# Altium PCB PY32E407Vx_START_ETH.PcbDoc (part 3 of 4)
Units mil, origin at the board's own origin, x right, y up, seen from the top; angles counter-clockwise.
Board outline 5249.65 x 2929.38 mil, 4 copper layers (Top Layer, GND, POWER, Bottom Layer); 253 components, 243 nets, 969 pads, 637 vias.
Unrouted connection lines stored in the file: 88.
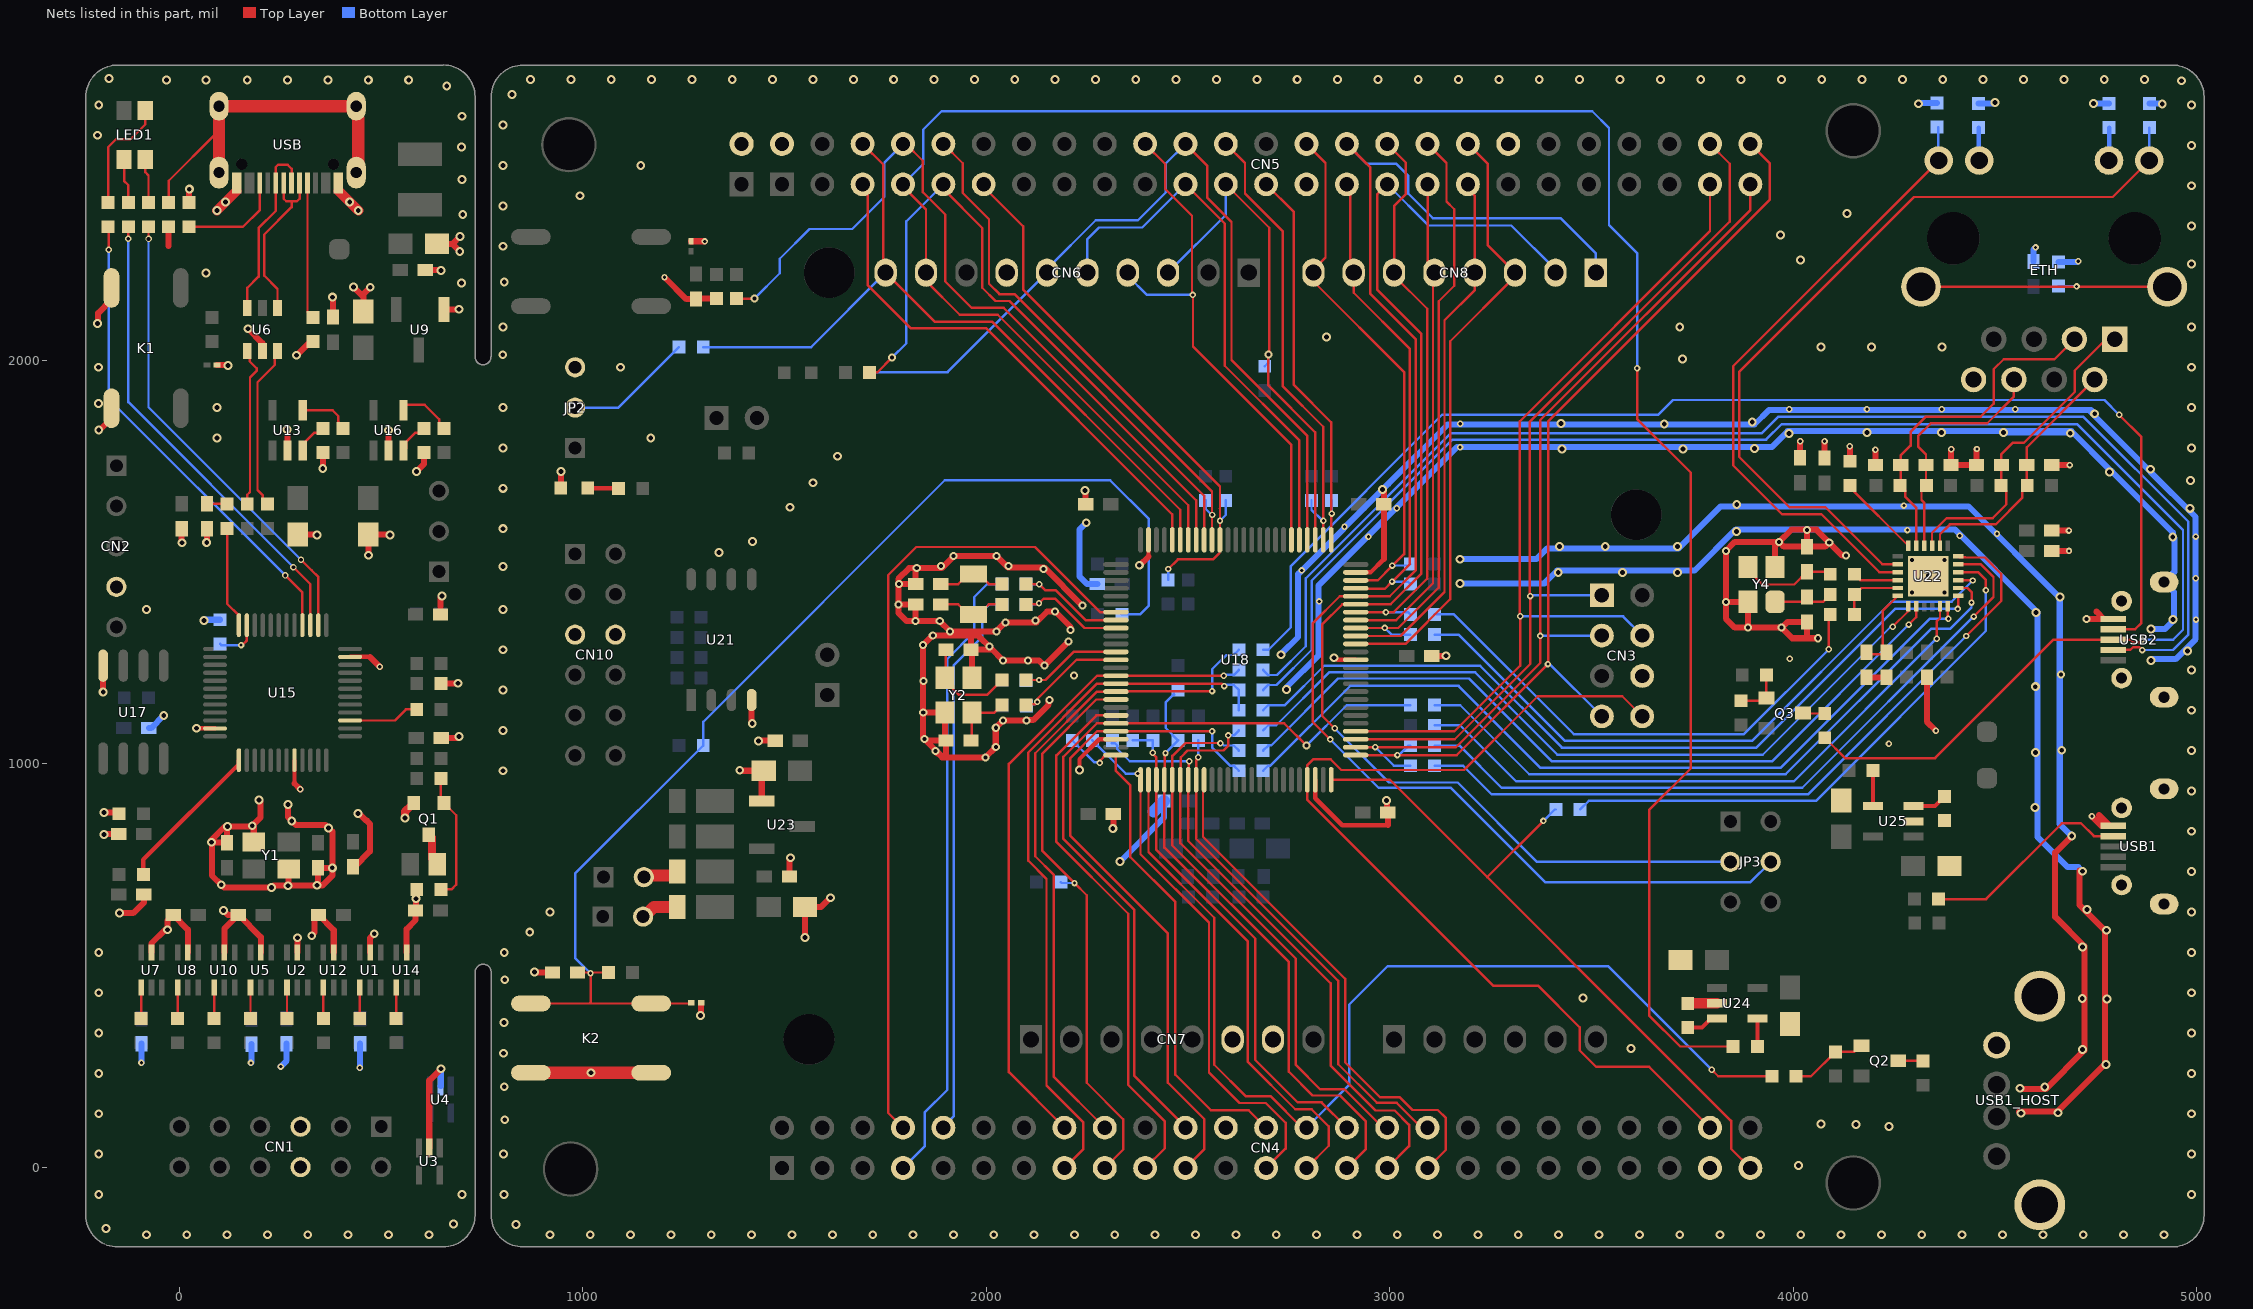
[diagram p4: the nets of this part, all layers, seen from the top]

## Via types
v1: diameter 22, hole 12, Top Layer to Bottom Layer, tented both sides, 393 vias
v2: diameter 16, hole 8, Top Layer to Bottom Layer, tented both sides, 115 vias
v3: diameter 20, hole 10, Top Layer to Bottom Layer, tented both sides, 54 vias
v4: diameter 16, hole 9, Top Layer to Bottom Layer, tented both sides, 41 vias
v5: diameter 30, hole 15, Top Layer to Bottom Layer, tented both sides, 16 vias
v6: diameter 20, hole 10, Top Layer to Bottom Layer, 9 vias
v7: diameter 15, hole 8, Top Layer to Bottom Layer, tented both sides, 5 vias
v8: diameter 16, hole 8, Top Layer to Bottom Layer, 3 vias
v9: diameter 20, hole 12, Top Layer to Bottom Layer, tented both sides, 1 vias

## Nets (pads, with @x,y where several pads share a name; then routed paths per layer and width w, separated by ;. In a path a pad name is that pad's centre, name@x,y a point inside that pad or via, vN(x,y) a via of type N, cw(c..) or ccw(c..) an arc to the next point about the centre after c; other vN are vias at no path point) (continued)
GND: C1.1 C2.1 C3.1 C4.1 C5.1 C6.1 C7.1 C8.1 C9.1 C10.1 C11.1 C12.1 C13.1 C14.1 C15.1 C16.1 C17.1 C18.1 C19.1 C20.1 C21.1 C22.1 C23.1 C24.1 C25.1 C26.1 C27.1 C28.1 C29.1 C30.1 C31.1 C32.1 C33.1 C34.1 C39.1 C40.1 C41.1 C42.1 C43.1 C44.1 C45.1 C46.1 C47.1 C48.1 C49.1 C50.2 C51.1 C52.1 C53.1 C54.1 C55.1 C56.1 C57.1 C58.1 C59.1 C60.1 C61.1 C62.1 CN1.5 CN1.6 CN2.4 CN3.6 CN4.24 CN4.47 CN5.2 CN5.27 CN5.38 CN6.7 CN7.6 CN7.7 CN10.5 CN10.6 CN11.2 ETH.8 JP2.3 K1.1 K2.2 L4.1 LED3.2 Q1.2 R1.1 R3.2 R7.2 R19.1 R20.1 R25.1 R27.2 R29.1 R32.2 R78.2 R82.1 R85.1 R93.1 R102.2 R103.1 R104.1 R106.1 R109.1 U1.2 U2.2 U3.2 U4.2 U5.2 U6.2 U7.2 U8.2 U9.1 U10.2 U11.2 U12.2 U13.2 U14.2 U15.8 U15.23 U15.47 U16.2 U17.4 U18.23 U18.48 U18.63 U18.74 U18.99 U19.2 U20.2 U21.4 U22.25 U23.1 U24.2 U25.2 USB1.5 USB1.6 USB1.7 USB1.8 USB1.9 USB1_HOST.4 USB1_HOST.5 USB2.5 USB2.6 USB2.7 USB2.8 USB2.9 USB.A1 USB.A12 USB.B1 USB.B12 Y1.2 Y1.4 Y2.2 Y2.4 Y4.2 Y4.4 | length 25054.4
  Top Layer w11: v1@42.64,1087.25 U15.47@88.04,1087.25 ; 285.03,950.62 U15.8@285.03,1008.18 ; U15.23@422.82,1264.27 472.02,1264.27 ; v1(2230.48,983.64) 2230.48,1011.16 2279.56,1060.24 U18.23@2320.76,1060.24 ; 2401.46,1512.92 U18.99@2401.46,1554.33 ; U18.48@2814.85,959.85 2814.85,913.94 2881.53,847.26 2994.61,847.26 ; v1(2860.83,1262.2) 2863.8,1262.2 2868.91,1257.09 U18.63@2915.24,1257.09 ; U18.74@2915.24,1473.63 2951.64,1473.63 2984.6,1506.59
  Top Layer w15: v1@-202.68,2090.73 v1(-202.93,2090.98) -201.59,2092.32 -201.59,2116.2 -168.61,2149.18 K1.1@-168.61,2178.71 ; v1(-200.02,1826.56) -198.13,1826.56 -166.61,1858.08 K1.1@-166.61,1871.26 ; U17.4@-189.3,1242.5 -189.3,1177.2 v1(-189.1,1177) ; v1(-187.5,824.4) -186.4,825.5 C22.1@-150.5,825.5 ; v1(-186.8,879.1) -153.1,879.1 R27.2@-149.5,875.5 ; v1(-148.9,629.19) -114.8,629.19 -88.5,655.49 C20.1@-88.5,675.5 ; U7.2@-69.37,531.35 -69.37,554.39 -35.78,587.99 v1(-30,587.99) -30,610.6 C9.1@-15.7,624.9 20.97,588.23 U8.2@20.97,531.35 ; -26.72,2282.14 R7.2@-26.72,2330.25 ; C5.1@5.5,1582 5.5,1548.19 v1(6.5,1547.19) ; R3.2@23.28,2390.25 23.28,2422.34 v1(24.38,2423.44) ; v1(42.5,1087.39) v1@42.64,1087.25 ; v1(67.41,1548.02) 68,1548.62 C16.1@68,1582 ; v1(79.73,804.88) 78.34,806.27 78.34,809.58 112.86,844.09 v1(119,844.09) 180,844.09 180.31,844.41 v1(180.31,845.73) 201.11,866.53 ; U11.2@92.8,1988 118.8,1988 v1(119.9,1986.9) ; v1(109.46,635.54) 120.09,624.9 C7.1@145.6,624.9 ; U10.2@111.31,531.35 111.31,590.61 C7.1@145.6,624.9 ; v1@118,843.09 C18.1@118,803.6 116.72,804.88 80.6,804.88 80.6,722.34 v1(103.41,699.53) 110.12,692.82 v1(228,692.82) 233.02,697.85 v1@340.42,697.85 ; USB.A12@141.34,2424.38 USB.A12@141.34,2454.43 ; v1(169.57,2077.44) 169.86,2077.44 205.5,2041.81 U6.2@205.5,2022.35 ; Y1.2@183.99,806.07 v1@183.99,842.05 ; v1(196.93,909.29) 200.79,905.43 200.79,866.85 ; U5.2@201.66,531.35 201.66,569.94 146.7,624.9 C7.1@145.6,624.9 ; v1(266.8,1827.9) 268,1826.7 U13.2@268,1775.5 ; v1(269.05,898.67) v1@269.3,898.92 ; v1@269.3,898.67 269.3,867.02 288.22,848.09 361.61,848.09 378.78,830.92 v1(378.78,741.6) ; v1@270.61,698.7 Y1.4@270.61,739.14 ; 285.03,950.62 v4(299.69,935.96) ; v1(290.2,2012) 323.7,2045.5 R1.1@330.5,2045.5 ; U2.2@292,531.35 292.07,531.42 292.07,567.82 v1(292.43,568.19) ; C6.1@293,1568 339.4,1568 v1(340.6,1566.8) ; v1(327.92,573.23) 327.92,575.12 334.56,581.76 334.56,622.22 337.24,624.9 C10.1@344.5,624.9 382.34,587.06 U12.2@382.34,531.35 ; v1(340.97,698.4) 354.87,698.4 378.78,722.31 v1(378.78,741.6) ; v1@343,700.43 C23.1@343,741.6 v1(378.78,741.6) ; v1(355.1,1731.5) 355.5,1731.9 R25.1@355.5,1770.5 ; v1(379.4,2155.8) 380.5,2154.7 C2.1@380.5,2106.5 ; USB.A1@394.32,2423.59 USB.A1@394.32,2454.49 ; C21.1@430.5,744.5 434.17,744.5 471.88,782.21 471.88,850.71 464.1,858.49 463.14,858.49 445.76,875.87 v1(442.78,875.87) ; v1(430.9,2181.4) 455.5,2156.8 ; C1.1@455.5,2120.5 455.5,2156.8 ; v1(468.62,1516.3) 468,1516.92 C15.1@468,1568 519.89,1568 v1(521.6,1566.29) ; 472.02,1264.27 v4(496.57,1239.72) ; U1.2@472.69,531.35 472.69,568.03 v1(482.82,578.16) ; v1(472.7,2180.4) 455.5,2163.2 455.5,2156.8 ; v1(517.6,1825.9) 518,1825.5 U16.2@518,1775.5 ; U14.2@563.03,531.35 563.03,589.77 585,611.74 C8.1@585,636.09 586,637.09 v1(586,665.09) 588,667.09 R19.1@588,688 ; Q1.2@573.6,895.37 Q1.2@580.6,902.37 ; v1(587.6,1723.94) 605.5,1741.84 R29.1@605.5,1770.5 ; C4.1@609.1,2223.2 646.7,2223.2 v1(647.8,2222.1) ; U3.2@619,47.46 619,214.18 v1(648.39,243.57) ; C3.1@638,2288 675.69,2288 ; C19.1@647,1369.3 647,1411.19 v1(650.8,1414.99) ; R20.1@648,1198 688.91,1198 v1(690,1199.09) ; C24.1@649,1063 689.21,1063 v1(693.1,1066.89) ; U9.1@655.5,2125.5 692.01,2125.5 v1(692.4,2125.89) ; v1(694.5,2269.19) 675.69,2288 ; v1(694.9,2306.09) 676.81,2288 675.69,2288 ; v1(879.9,482.99) 880.8,482.09 C29.1@924.5,482.09 ; LED3.2@945,1683.09 945,1723.19 v1(945.5,1723.69) ; v2(1202,2205.09) 1256,2151.09 C39.1@1280.5,2151.09 1281.5,2152.09 R82.1@1330.5,2152.09 ; U20.2@1268,2294.4 1301.1,2294.4 v2(1301.55,2293.94) ; v1(1291.5,375.24) 1292.8,376.54 U19.2@1292.8,407.09 ; v1(1388.5,983.39) 1389.8,982.09 C55.1@1448,982.09 1443,977.09 U23.1@1443,907.09 ; U21.4@1418,1157.49 1418,1100.59 v1(1419.4,1099.19) ; v1(1434.7,1055.49) 1435.8,1056.59 C56.1@1476.4,1056.59 ; C57.1@1511.6,720.29 1511.6,763.79 v1(1514.4,766.59) ; v1(1550.34,569.03) 1550.5,569.19 C54.1@1550.5,644.59 1590.3,644.59 v1(1613.21,667.51) ; v3@1781.7,1395.19 v3(1782.3,1394.59) C28.1@1824.5,1394.59 v3(1824.5,1353.19) v3@1824.6,1353.09 ; v3(1782.7,1444.59) C27.1@1824.5,1444.59 1824.5,1481.79 v3(1827.2,1484.49) ; v3(1843.29,1126.28) Y2.4@1897.03,1126.28 1897.03,1057.09 v3@1849.7,1057.09 ; v3(1873.6,1030.69) 1879.11,1025.19 1880.26,1025.19 1890.15,1015.29 1891.5,1015.29 ; C26.1@1899.5,1057.09 1899.5,1015.79 1900,1015.29 ; 1961.5,1316.59 C25.1@1961.5,1282.09 ; Y2.2@1963.96,1212.9 1963.96,1279.63 C25.1@1961.5,1282.09 ; v3(2007,1290.49) 2007,1289.59 v3@2012.8,1283.79 ; v3@2098.7,1106.39 v3(2040.7,1106.39) v3(2023,1088.69) v3(2023,1040.79) v3(1997.5,1015.29) 1891.5,1015.29 ; v3@2099.68,1107.78 2115.68,1107.78 2153.78,1145.88 2153.78,1154.94 v3(2156.6,1157.76) v3@2158.2,1157.76 ; v3(2203.4,1302.59) v3(2143.3,1242.49) 2129.9,1255.89 v3(2102.4,1255.89) v3(2040.7,1255.89) v3@2012.8,1283.79 ; v3(2208.6,1331.19) 2208.6,1338.49 v3(2170.2,1376.89) 2150.4,1376.89 2123.35,1349.85 v3(2046.85,1349.85) v3(2024.7,1327.69) v3(1909.6,1327.69) v3(1884.2,1353.09) v3@1824.6,1353.09 ; v3(2237.6,1391.29) 2142.7,1486.19 2053,1486.19 v3(2025.2,1513.99) v3(1918.38,1513.99) 1888.88,1484.49 v3(1827.2,1484.49) ; v1(2244.3,1676.89) 2245.7,1675.49 C34.1@2245.7,1642.49 ; v1(2313.1,839.19) 2314.54,840.63 C32.1@2314.54,875.01 ; v1(2378.76,1491.31) 2379.86,1491.31 2401.46,1512.92 ; v1(2981.33,1679.59) 2984.6,1676.31 C33.1@2984.6,1642.49 2984.6,1506.59 ; v1(2991.68,908.4) 2993.02,907.06 C31.1@2993.02,875.17 ; 2994.61,847.26 C31.1@2994.61,878.2 ; C30.1@3103.8,1266.29 3137.94,1266.29 v1(3138.8,1267.16) ; v3(3832.9,1400.79) Y4.4@3887.53,1400.79 3887.53,1337.13 v3(3887.1,1336.7) ; Y4.2@3954.46,1487.4 3954.46,1539.36 v3(3964.41,1549.3) ; C48.1@4016.2,1757.89 4016.2,1798.49 v2(4016.7,1798.99) ; 4033.5,1315.04 C51.1@4033.5,1350.59 3984.59,1350.59 v3(3970.7,1336.7) ; v3(4033.5,1578.79) C50.2@4033.5,1537.59 ; v3(4061,1310.49) 3996.9,1310.49 v3(3970.7,1336.7) ; C47.1@4076.7,1757.19 4076.7,1798.29 v2(4076.9,1798.49) ; v3(4088.65,1547.64) 4078.6,1537.59 C50.2@4033.5,1537.59 ; v3(4130.2,1515.39) 4120.9,1515.39 4056.4,1579.89 3995,1579.89 v3(3964.41,1549.3) ; v2(4139.5,1786.29) 4139.7,1786.09 R102.2@4139.7,1749.09 ; C52.1@4180.5,1213.59 C53.1@4230.5,1213.59 ; v2(4203.1,1777.59) 4203.4,1777.29 C41.1@4203.4,1739.59 ; C49.1@4330.5,1213.59 4330.5,1103.79 v2(4353.1,1081.19) ; v2(4391.2,1778.89) 4390.4,1778.09 C42.1@4390.4,1739.59 C43.1@4453.4,1739.59 4453.4,1778.39 v2(4454.5,1779.49) ; v1@4558.7,137.29 4654.1,137.29 4771.91,255.1 4771.91,586.39 4709.26,649.04 4709.26,734.45 4714.88,734.45 v1(4716.11,733.22) ; v1@4560.6,193.19 4625.05,193.19 4720.9,289.05 4720.9,547.89 4648.6,620.19 4648.6,779.13 v1(4689.69,820.22) ; C45.1@4640,1527.09 4682.58,1527.09 v2(4682.74,1526.86) v2(4682.74,1526.86) ; C46.1@4640,1577.09 4682.44,1577.09 v2(4682.72,1577.37) ; C44.1@4640.4,1739.59 4640.5,1739.69 v2(4684.5,1739.69) ; v6(4726,1357.99) 4726.12,1357.99 4726.4,1358.27 USB2.5@4792.65,1358.27 4769.02,1358.27 4751.15,1376.15 ; v2(4739.5,869.39) 4763.12,845.77 USB1.5@4783.82,845.77 ; 4757.6,871.99 USB1.5@4783.82,845.77 ; USB1.5@4792.65,845.77 USB1.5@4783.82,845.77 ; v3@1824.6,1353.09 1802.3,1353.09 1781.7,1373.69 1781.7,1457.79 1808.4,1484.49 v3(1827.2,1484.49) ; v3@1849.7,1057.09 1843,1063.79 v3(1843,1293.89) v3(1866.9,1317.79) 1978.8,1317.79 v3@2012.8,1283.79 ; v3@1849.7,1057.09 1891.5,1015.29 ; C25.1@1961.5,1282.09 2011.1,1282.09 v3@2012.8,1283.79 ; v3(3964.41,1549.3) 3976.12,1537.59 C50.2@4033.5,1537.59 ; v3(3964.41,1549.3) 3854.89,1549.3 v3(3832.39,1526.8) 3832.39,1359.01 3854.7,1336.7 v3(3970.7,1336.7)
  Top Layer w20: v1(559.11,864.91) 559.11,880.88 Q1.2@573.6,895.37
  Top Layer w25: v1(92.86,2370.4) v1(114.23,2391.77) USB.A12@141.38,2418.92 ; USB.A1@394.62,2418.92 v1(421.77,2391.77) v1(443.14,2370.4) ; R85.1@3738.01,405.81 3738.08,405.89 3810.5,405.89 U24.2@3810.58,405.96
  Top Layer w30: K2.2@871,233.59 K2.2@1169,233.59
  Bottom Layer w15: C12.1@-94.3,305.6 v2(-94.3,258.39) v2@-94,258.09 ; C17.1@-76,1088 -70.1,1088 v1(-38.9,1119.2) ; v1(61.1,1354.39) 63.1,1356.39 R32.2@100.8,1356.39 ; v2(177,258.09) 178.2,259.29 C13.1@178.2,304.3 ; v2(251,249.09) 265.7,263.79 C11.1@265.7,305.7 ; v2(447,246.09) 447.9,246.99 C14.1@447.9,305.7 ; U4.2@647,200.46 647.7,201.16 647.7,242.87 v1(648.39,243.57) ; v1(2247.1,1596.79) 2230.1,1579.79 2230.1,1464.19 2249.7,1444.59 C58.1@2274.5,1444.59 ; v1(2330.8,756.95) 2440.4,866.55 R78.2@2440.4,907.19 ; v1(2730.3,1269.49) 2730.3,1271.79 2772.11,1313.6 2772.11,1469.41 2774.8,1472.09 2996.09,1693.38 ; v1(2743.43,1183.82) 2743.43,1188.93 2823.22,1268.72 2823.22,1441.62 3166.55,1784.95 3946.85,1784.95 3985.62,1823.71 v1@4688.98,1823.71 ; v1(2981.33,1679.59) 2982.29,1679.59 2996.09,1693.38 ; v1(3173.2,1446.49) 3382.5,1446.49 3414.5,1478.49 3755,1478.49 3857,1580.49 4399.6,1580.49 v1@4604.5,1375.59 ; v1(3173.2,1506.39) 3362.61,1506.39 3389.01,1532.79 3714.9,1532.79 3819.3,1637.19 4433.7,1637.19 4659.9,1410.99 4659.9,850.3 4661.37,848.83 4661.37,848.42 4689.58,820.22 v1(4689.69,820.22) 4686.88,823.03 v1@4686.88,824.84 ; v1(3679.69,1841.89) 3681.25,1840.33 v1@3903.43,1840.33 ; v1(4309.48,2635.12) 4311.46,2637.09 R104.1@4355.5,2637.09 ; R106.1@4459,2636.09 4497.36,2636.09 v1(4499.61,2638.34) ; v1(4520.38,1820.15) 4685.42,1820.15 v1@4688.98,1823.71 ; C40.1@4594.5,2244.09 4594.5,2273.59 v2(4600,2279.09) ; v1(4600.86,1374.3) 4603.2,1374.3 v1@4604.5,1375.59 ; L4.1@4657,2243.09 4704,2243.09 v2(4705.5,2244.59) ; v1(4716.11,733.22) 4706.08,743.25 4679.74,743.25 4604.5,818.49 4604.5,890.77 4604.5,1032.22 4604.5,1190.49 v1@4604.5,1375.59 ; v1(4743.69,2636.07) R109.1@4782,2636.09 ; v1(4746.43,1866.91) 4736.63,1876.71 4731.08,1876.71 ; v1(4783.11,1722.47) 4789.94,1722.47 4939.87,1572.55 v1(4939.87,1561.82) 4943.3,1558.38 4943.7,1558.38 4943.7,1475.15 USB2.7@4918.35,1449.8 4942.78,1425.37 4942.78,1359.02 v1(4940.65,1356.89) ; v1@4786.67,1726.03 v1@4688.98,1823.71 ; R103.1@4882,2636.09 4912.44,2636.09 v1(4913.76,2634.78) ; v1(4884.42,1729.44) 4884.42,1723.37 4996.8,1610.99 ; v1(4886.1,1255.3) 4889.43,1258.64 4947.18,1258.64 4996.8,1308.26 4996.8,1610.99 ; v1@4888.51,1330.89 v1(4886.1,1333.29) 4920.41,1333.29 v1@4940.65,1353.53 ; 2996.09,1693.38 3143.03,1840.33 v1@3903.43,1840.33 ; v1@3903.43,1840.33 3939.82,1876.71 4731.08,1876.71 ; 4731.08,1876.71 4996.8,1610.99
  Bottom Layer w30: 2414.4,881.19 R78.2@2440.4,907.19
  other v1: -82,-167.91 18,-167.91 118,-167.91 218,-167.91 318,-167.91 418,-167.91 518,-167.91 618,-167.91 918,-167.91 1018,-167.91 1118,-167.91 1218,-167.91 1318,-167.91 1418,-167.91 1518,-167.91 1618,-167.91 1718,-167.91 1818,-167.91 1918,-167.91 2018,-167.91 2118,-167.91 2218,-167.91 2318,-167.91 2418,-167.91 2518,-167.91 2618,-167.91 2718,-167.91 2818,-167.91 2918,-167.91 3018,-167.91 3118,-167.91 3218,-167.91 3318,-167.91 3418,-167.91 3518,-167.91 3618,-167.91 3718,-167.91 3818,-167.91 3918,-167.91 4018,-167.91 4118,-167.91 4218,-167.91 4318,-167.91 4418,-167.91 4518,-167.91 4618,-167.91 4718,-167.91 4818,-167.91 4918,-167.91 -182,-151.91 833.96,-142.12 678.76,-140.85 -200,-67.91 700,-67.91 804,-67.91 4986,-67.91 4012.37,4.18 -200,32.09 803,32.09 4986,32.09 4236.71,100.63 4154.5,105.23 4068,107.09 806,117.09 -200,132.09 4986,132.09 4564.07,133.4 4655.66,134.66 4561.61,195.4 4622.77,198.53 805,199.09 -200,232.09 4986,232.09 1020,233.59 4774.65,253.93 803,282.09 4715.92,291.09 3597.36,293.89 -200,332.09 4986,332.09 804,358.09 4777.1,416.27 4715.62,417.47 3478.66,418.72 -200,432.09 4986,432.09 806,464.09 -200,532.09 805,532.09 4986,532.09 4715.94,545.57 868,582.09 4775.74,586.97 918,632.09 4986,632.09 4727.01,638.57 269,697.09 4986,732.09 4986,832.09 369.17,840.53 278.29,858.03 4598.86,890.77 4986,932.09 802,982.09 4600,1027.09 4986,1032.09 4664.91,1033.05 802,1082.09 4986,1132.09 802,1182.09 4599.3,1190.49 4986,1232.09 4976.16,1279.08 802,1282.09 -82,1382.09 802,1382.09 4660.78,1412.8 3417.12,1473.15 3576.08,1473.33 3712.6,1473.53 802,1488.09 1336.8,1522.89 3420.44,1538.04 3533.62,1537.99 3712.45,1537.97 1420.1,1550.69 3859.03,1575.43 802,1582.09 4982.77,1632.55 1512.8,1635.09 3859.49,1641.92 802,1682.09 1570.1,1695.99 4983.9,1701.29 1630.4,1761.59 3426.61,1779.85 3726.4,1779.79 3903.69,1780.4 802,1782.09 4986,1782.09 93,1807.09 1168,1807.09 3988.62,1817.95 4685.9,1818.65 4182.4,1820.15 4366.6,1820.15 3424.17,1843.05 3897.7,1846.79 93,1882.09 802,1882.09 4986,1882.09 -201,1892.09 -201,1982.09 1093,1982.09 4986,1982.09 3724.58,2002.32 801,2013.09 4068,2032.09 4193,2032.09 4368,2032.09 2843,2057.09 802,2082.09 3718,2082.09 4986,2082.09 699,2191.09 805,2193.09 65.99,2215.64 4986,2238.09 4017,2248.09 802,2282.09 3968,2310.09 4986,2332.09 702,2361.09 4133,2363.09 802,2382.09 993,2407.09 4986,2432.09 700,2447.09 802,2482.09 1143,2482.09 699,2528.09 4986,2532.09 -203.37,2557.18 802,2582.09 700,2604.09 -200,2632.09 4986,2632.09 823.72,2657.76 662.32,2679.51 4962,2692.09 -32,2694.09 66,2694.09 168,2694.09 268,2694.09 368,2694.09 468,2694.09 568,2694.09 870,2695.09 970,2695.09 1070,2695.09 1170,2695.09 1270,2695.09 1370,2695.09 1470,2695.09 1570,2695.09 1670,2695.09 1770,2695.09 1870,2695.09 1970,2695.09 2070,2695.09 2170,2695.09 2270,2695.09 2370,2695.09 2470,2695.09 2570,2695.09 2670,2695.09 2770,2695.09 2870,2695.09 2970,2695.09 3070,2695.09 3170,2695.09 3270,2695.09 3370,2695.09 3470,2695.09 3570,2695.09 3670,2695.09 3770,2695.09 3870,2695.09 3970,2695.09 4070,2695.09 4170,2695.09 4270,2695.09 4370,2695.09 4470,2695.09 4570,2695.09 4670,2695.09 4770,2695.09 4870,2695.09 -174.29,2697.44
  other v2: 4236.47,1049.29 3990.68,1259.83 2824.77,1401.74 2781.04,1478.69 2946.41,1562.33 4412.1,1564.79 4504.4,1569.69 4282.3,1578.59 2887.21,1586.96 3016.87,1632.8 4273.8,1639.19 3173.63,1783.63 3174.39,1841.92 4182,1877.79 4549.5,1877.79 3989.3,1878.09 4367.6,1877.99
  other v3: 1846.35,1060.44 2098.7,1106.79 1843.4,1204.29 2216.94,1217.83 4663.4,1221.19 2121.18,1354.21 4293.3,1424.29 4373.7,1424.29 2140.92,1481.84 1886.81,1489.23 2054.82,1490.11
  other v6: 4333.1,1465.49 4293.3,1504.69 4373.7,1504.69
  other v8: 4997.55,1356.78 4997.17,1459.31 4997,1562.49
L_USB_CN_DM: U6.4 USB.A7 USB.B7 | length 429.3
  Top Layer w6: U6.4@242.9,2128.65 242.9,2176.2 210,2209.1 210,2311.09 277.85,2378.94 277.85,2393.5 ; USB.A7@258.16,2438.92 258.16,2399.87 264.53,2393.5 277.85,2393.5 ; USB.B7@297.53,2438.92 297.53,2399.87 291.16,2393.5 277.85,2393.5
L_USB_CN_DP: U6.6 USB.A6 USB.B6 | length 459.8
  Top Layer w6: U6.6@168.1,2128.65 168.1,2178.79 196,2206.69 196,2327.24 238.47,2369.71 USB.B6@238.47,2438.92 238.47,2478.14 244.33,2484 268,2484 277.84,2474.16 USB.A6@277.84,2438.92
LAN8720_CRS_DV: R58.1 U22.11 | length 1531.5
  Top Layer w6: v2(4354.82,1309.49) 4354.82,1351.91 4363.03,1360.12 U22.11@4363.03,1389.49
  Bottom Layer w6: R58.1@3110.5,1094.59 3174.1,1094.59 3312.59,956.1 4000.92,956.1 4354.31,1309.49 v2(4354.82,1309.49)
LAN8720_ETH_LINK: ETH.12 R104.2 U22.3 | length 1567
  Top Layer w6: U22.3@4258.4,1474.43 4212.46,1474.43 4069.1,1617.79 3971.7,1617.79 3850.7,1738.79 3850.7,1985.08 ETH.12@4360.17,2494.55
  Bottom Layer w6: R104.2@4359,2577.09 4359,2495.72 ETH.12@4360.17,2494.55
LAN8720_ETH_RXN: C42.2 ETH.6 R99.1 U22.22 | length 608.1
  Top Layer w6: U22.22@4323.66,1539.69 4323.66,1646.73 4317.21,1653.18 4317.21,1677.41 R99.1@4329.4,1689.59 4328.4,1690.59 C42.2@4328.4,1739.59 4328.4,1766.04 4308.99,1785.45 4308.99,1811.69 4340.67,1843.36 4480.27,1843.36 4546.19,1909.29 ETH.6@4546.19,1951.64
LAN8720_ETH_RXP: C41.2 ETH.3 R98.1 U22.23 | length 860.2
  Top Layer w6: U22.23@4303.97,1539.69 4303.97,1634.42 4276.54,1661.86 4276.54,1677.46 R98.1@4264.4,1689.59 4265.4,1690.59 C41.2@4265.4,1739.59 4265.4,1763.09 4290.2,1787.89 4290.2,1821.23 4328.69,1859.72 4464.23,1859.72 4496.46,1891.95 4496.46,1977.55 4521,2002.09 4646.65,2002.09 ETH.3@4696.19,2051.64
LAN8720_ETH_SPD: ETH.9 R103.2 U22.2 | length 2029
  Top Layer w6: U22.2@4258.4,1494.12 4219.87,1494.12 4078.9,1635.09 3990.2,1635.09 3865.1,1760.19 3865.1,1970.19 4299,2404.09 4791.37,2404.09 ETH.9@4881.83,2494.55
  Bottom Layer w6: ETH.9@4881.83,2494.55 4881.83,2575.92 R103.2@4882,2576.09
LAN8720_ETH_TXN: C44.2 ETH.2 R101.1 U22.20 | length 638
  Top Layer w6: U22.20@4363.03,1539.69 4363.03,1568.12 4387.69,1592.79 4501.29,1592.79 4566.64,1658.13 4566.64,1676.83 R101.1@4579.4,1689.59 4578.4,1690.59 C44.2@4578.4,1739.59 4578.4,1783.84 ETH.2@4746.19,1951.64
LAN8720_ETH_TXP: C43.2 ETH.1 R100.1 U22.21 | length 805.9
  Top Layer w6: U22.21@4343.34,1539.69 4343.34,1571.96 4379.81,1608.43 4493.64,1608.43 4527.43,1642.22 4527.43,1676.56 R100.1@4514.4,1689.59 4515.4,1690.59 C43.2@4515.4,1739.59 4515.4,1767.11 4542.87,1794.58 4570.48,1794.58 4696.95,1921.05 4696.95,1974.05 4774.55,2051.64 ETH.1@4796.2,2051.64
LAN8720_MCO: R69.1 R108.2 | length 1275.9
  Top Layer w6: v2(4087.62,1283.38) 4087.77,1283.54 4087.77,1362.17 4085.92,1364.02 R108.2@4091,1369.09
  Bottom Layer w6: R69.1@3110.5,1369.59 3158.7,1369.59 3455.5,1072.79 3877.03,1072.79 v2(4087.62,1283.38)
LAN8720_MDC: R61.1 U22.13 | length 2026.4
  Top Layer w6: v2(4407.1,1383.16) 4408.6,1384.66 U22.13@4408.6,1415.38
  Bottom Layer w6: R61.1@2685.5,1132.09 2698.28,1144.88 2739.62,1144.88 2836.94,1242.2 3223.29,1242.2 3426,1039.49 3908.2,1039.49 4251.86,1383.16 v2(4407.1,1383.16)
LAN8720_MDIO: R66.1 U22.12 | length 2054
  Top Layer w6: U22.12@4382.71,1389.49 4382.71,1360.35 v2(4383.95,1359.11)
  Bottom Layer w6: R66.1@2685.5,982.09 2698.44,995.03 2703.8,995.03 2901.38,1192.61 3169.98,1192.61 3373.4,989.19 3968.1,989.19 4338.01,1359.11 v2(4383.95,1359.11)
LAN8720_nINT: R67.1 U22.14 | length 1648.2
  Top Layer w6: U22.14@4408.6,1435.06 4431.03,1435.06 4442,1424.09 4442,1399.84 v2(4441.13,1398.97)
  Bottom Layer w6: R67.1@3110.5,1144.59 3174.1,1144.59 3345.2,973.49 3980.5,973.49 4340.86,1333.85 4387.96,1333.85 4441.13,1387.02 v2(4441.13,1398.97)
LAN8720_nRST: R68.1 U22.15 | length 1642.9
  Top Layer w6: U22.15@4408.6,1454.75 4443.15,1454.75 v2(4444.23,1453.67)
  Bottom Layer w6: R68.1@3110.5,1319.59 3170,1319.59 3432.58,1057.01 3898.22,1057.01 4242.33,1401.13 4391.69,1401.13 v2(4444.23,1453.67)
LAN8720_RXD0: R59.1 U22.8 | length 1952.4
  Top Layer w6: v2(4285.7,1344.39) 4303.97,1362.66 U22.8@4303.97,1389.49
  Bottom Layer w6: R59.1@2685.5,1032.09 2698.5,1045.09 2705.76,1045.09 2871.42,1210.76 3196.04,1210.76 3401.4,1005.39 3946.7,1005.39 v2(4285.7,1344.39)
LAN8720_RXD1: R60.1 U22.7 | length 1902
  Top Layer w6: v2(4245.8,1338.99) 4284.29,1377.48 U22.7@4284.29,1389.49
  Bottom Layer w6: R60.1@2685.5,1082.09 2698.21,1094.81 2718.2,1094.81 2849.14,1225.75 3211.15,1225.75 3415,1021.89 3923.8,1021.89 4240.9,1338.99 v2(4245.8,1338.99)
LAN8720_TXD0: R62.1 U22.17 | length 1774.3
  Top Layer w6: U22.17@4408.6,1494.12 4463.89,1494.12 4495.62,1462.39 4495.62,1413.08 v2(4446.65,1364.11)
  Bottom Layer w6: R62.1@3110.5,1044.59 3172.1,1044.59 3276.78,939.91 4021.55,939.91 4446.2,1364.56 v2(4446.65,1364.11)
LAN8720_TXD1: R63.1 U22.18 | length 1823.9
  Top Layer w6: U22.18@4408.6,1513.8 4411.11,1511.29 4425.47,1511.29 4426.17,1510.59 4474.54,1510.59 4515.03,1470.1 4515.03,1403.03 v2(4428.06,1316.06)
  Bottom Layer w6: R63.1@3110.5,994.59 3181.37,994.59 3252.24,923.73 4036,923.73 v2@4428.06,1315.79
LAN8720_TXEN: R64.1 U22.16 | length 1391.5
  Top Layer w6: U22.16@4408.6,1474.43 4457.18,1474.43 4476.75,1454.86 v2(4476.75,1429.3)
  Bottom Layer w6: R64.1@3471.05,886.09 3492.5,907.54 4055.65,907.54 4476.6,1328.49 4476.6,1429.15 v2(4476.75,1429.3)
LAN8720_VDDCR: C52.2 C53.2 U22.6 | length 210.3
  Top Layer w6: C52.2@4171,1270.59 4221,1270.59 4221,1377.98 U22.6@4258.4,1415.38
LAN8720_XTAL1: R107.2 R108.1 U22.5 | length 163.4
  Top Layer w6: R108.1@4151,1369.09 R107.2@4151,1419.09 ; R107.2@4152,1418.09 4168.97,1435.06 U22.5@4258.4,1435.06
LAN8720_XTAL2: R105.2 U22.4 | length 113.3
  Top Layer w6: R105.2@4151,1469.09 4165.34,1454.75 U22.4@4258.4,1454.75
LED_BLUE: R8.2 U15.28 | length 1186.7
  Top Layer w6: R8.2@-176.72,2330.25 -175.7,2329.23 v4(-175.7,2273.69) ; v4(262.3,1466.2) 304.71,1423.78 U15.28@304.71,1343.01
  Bottom Layer w6: v4(-175.7,2273.69) -175.7,1904.19 v4(262.3,1466.2)
LED_GREEN: R5.2 U15.26 | length 1161.5
  Top Layer w6: v4(-76.72,2300.1) R5.2@-76.72,2330.25 ; v4(301.2,1505.1) 327.64,1478.66 344.08,1462.22 U15.26@344.08,1343.01
  Bottom Layer w6: v4(-76.72,2300.1) -76.72,1883.01 v4(301.2,1505.1)
LED_RED: R4.2 U15.27 | length 1174.1
  Top Layer w6: v4(-126.72,2300.45) R4.2@-126.72,2330.25 ; v4(282.5,1486.4) 324.4,1444.5 U15.27@324.4,1343.01
  Bottom Layer w6: v4(-126.72,2300.45) -126.72,1895.61 v4(282.5,1486.4)
NetC16_2: C16.2 R30.2 | length 50.4
  Top Layer w6: C16.2@68,1644 117,1644 R30.2@118,1643
NetC50_1: C50.1 R105.1 Y4.3 | length 242.2
  Top Layer w6: Y4.3@3887.53,1487.4 3887.53,1479.22 3922.93,1443.83 4001.74,1443.83 C50.1@4033.5,1475.59 4084.5,1475.59 R105.1@4091,1469.09
NetC51_2: C51.2 R107.1 Y4.1 | length 144.1
  Top Layer w6: Y4.1@3954.46,1400.79 4072.69,1400.79 R107.1@4091,1419.09
NetD3_2: D3.2 JP6.2 | length 94.8
  Top Layer w30: JP6.2@1148.91,620.65 1151.78,620.65 1175.72,644.59 D3.2@1233.75,644.59
NetD4_2: D4.2 JP7.2 | length 91.2
  Top Layer w30: JP7.2@1150.73,718.4 1154.56,722.23 1228.08,722.23 1233.75,727.9 D4.2@1233.75,732.09
NetETH_10: ETH.10 R109.2 | length 81.6
  Bottom Layer w11: ETH.10@4781.83,2494.55 4782,2494.72 R109.2@4782,2576.09
NetETH_11: ETH.11 R106.2 | length 82
  Bottom Layer w11: R106.2@4459,2576.09 4459,2495.72 ETH.11@4460.17,2494.55
NetETH_SH1: ETH.SH1 ETH.SH2 L4.2 | length 655.5
  Top Layer w6: ETH.SH2@4316.08,2181.56 4700.93,2181.56 v2(4701.7,2182.33) 4702.46,2181.56 ETH.SH1@4925.92,2181.56
  Bottom Layer w6: L4.2@4657,2183.09 4700.93,2183.09 v2(4701.7,2182.33)
NetJP2_2: JP2.2 R65.1 | length 319.6
  Bottom Layer w6: JP2.2@980.5,1882.09 1088,1882.09 R65.1@1238,2032.09
NetLED1_2: LED1.2 R8.1 | length 287.5
  Top Layer w6: R8.1@-176.72,2390.25 -176.72,2527.94 -157.41,2547.25 -121.72,2547.25 -84.94,2584.03 LED1.2@-84.94,2618.86
NetLED1_3: LED1.3 R5.1 | length 110
  Top Layer w6: LED1.3@-84.94,2496.82 -84.94,2465.87 -76.72,2457.65 R5.1@-76.72,2390.25
NetLED1_4: LED1.4 R4.1 | length 111
  Top Layer w6: LED1.4@-137.31,2496.82 -137.31,2443.84 -126.72,2433.25 R4.1@-126.72,2390.25
NetLED3_1: LED3.1 R112.1 | length 76.4
  Top Layer w12: LED3.1@1012,1683.09 1013,1682.09 R112.1@1088,1682.09
NetQ1_1: Q1.1 R18.1 R19.2 | length 329
  Top Layer w6: R19.2@648,688 673.86,688 685.89,700.04 685.89,871.88 Q1.1@655.4,902.37 ; Q1.1@648,909.77 R18.1@648,963
  Top Layer w15: R19.2@648,688 R19.2@655.5,688 ; Q1.1@648,909.77 Q1.1@655.4,902.37
NetQ1_3: Q1.3 R15.1 | length 81.8
  Top Layer w15: Q1.3@618,823.63 Q1.3@625.29,816.34 ; R15.1@625.29,764.18 R15.1@638.96,750.5
  Top Layer w20: R15.1@625.29,764.18 Q1.3@625.29,816.34
NetQ2_1: Q2.1 R113.2 R114.1 | length 193.8
  Top Layer w6: R114.1@4006.49,224.94 4043.46,224.94 R113.2@4103.98,285.46 4150.02,285.46 4165.06,300.5 Q2.1@4169,300.5
NetQ2_3: Q2.3 R115.2 | length 61.9
  Top Layer w6: Q2.3@4259.55,263.1 4320.77,263.1 R115.2@4321.23,262.64
NetQ3_1: Q3.1 R116.2 R117.1 | length 123.1
  Top Layer w6: R116.2@3869.41,1155.67 3926.09,1155.67 Q3.1@3932.87,1162.45 3932.87,1219.15 R117.1@3932.98,1219.26
NetQ3_3: Q3.3 R118.2 | length 54.5
  Top Layer w6: Q3.3@4023.42,1125.05 4024.47,1124 R118.2@4077.51,1124
NetR1_2: R1.2 USB.A5 | length 338.9
  Top Layer w6: USB.A5@317.21,2438.92 317.21,2118.79 R1.2@330.5,2105.5
NetR2_1: R2.1 U1.4 | length 78.4
  Top Layer w6: R2.1@443,368 447.09,372.1 U1.4@447.09,444.73
NetR3_1: R3.1 USB.B5 | length 260
  Top Layer w6: R3.1@23.28,2330.25 157.24,2330.25 199.1,2372.11 USB.B5@199.1,2438.92
NetR6_1: R6.1 U2.4 | length 77.4
  Top Layer w6: U2.4@266.41,444.73 266.41,369.59 R6.1@268,368
NetR7_1: R7.1 USB.1 USB.2 USB.3 USB.4 | length 880
  Top Layer w6: R7.1@-26.72,2390.25 -26.72,2444.34 90.7,2561.77
  Top Layer w30: USB.2@97.92,2464.52 USB.4@97.92,2626.13 ; USB.4@97.92,2629.08 USB.3@438.08,2629.08 ; USB.3@441.38,2624.51 441.38,2601.78 443,2600.16 443,2489.85 441.38,2488.23 441.38,2470.07 USB.1@443,2468.45
NetR9_1: R9.1 U5.4 | length 80.1
  Top Layer w6: R9.1@168,368 176.07,376.07 U5.4@176.07,444.73
NetR10_1: R10.1 U6.3 | length 410
  Top Layer w6: R10.1@218,1643 206.7,1654.3 206.7,1664.67 193.4,1677.96 193.4,1945.1 236.23,1987.93 236.23,2015.68 U6.3@242.9,2022.35
NetR11_1: R11.1 U6.1 | length 398.6
  Top Layer w6: R11.1@168,1643 168.11,1643.11 168.11,1666.31 174.8,1673 174.8,1956.48 191.25,1972.93 191.25,1979.55 174.02,1996.79 174.02,2016.43 U6.1@168.1,2022.35
NetR12_1: R12.1 U7.4 | length 76.7
  Top Layer w6: R12.1@-95,368 U7.4@-94.96,444.73 U7.4@-94.96,444.73
NetR13_1: R13.1 U8.4 | length 76.8
  Top Layer w6: R13.1@-4.71,368 -4.62,368.1 U8.4@-4.62,444.73
NetR17_1: R17.1 U10.4 | length 76.8
  Top Layer w6: R17.1@85.57,368 85.72,368.15 U10.4@85.72,444.73
NetR21_1: R21.1 U12.4 | length 77.3
  Top Layer w6: R21.1@355.5,368 356.75,369.25 U12.4@356.75,444.73
NetR23_2: R23.2 U13.4 | length 124.7
  Top Layer w6: U13.4@305.5,1875.5 379.38,1875.5 393.5,1861.38 393.5,1847.5 R23.2@405.5,1835.5
NetR24_1: R24.1 U14.4 | length 79.6
  Top Layer w6: R24.1@524.5,368 R24.1@531.44,374.94 ; R24.1@537.44,374.94 U14.4@537.44,444.73
NetR25_2: R25.2 U13.3 | length 82
  Top Layer w6: U13.3@305.5,1775.5 311.5,1781.5 311.5,1797.19 333.67,1819.36 344.36,1819.36 R25.2@355.5,1830.5
NetR26_2: R26.2 U15.1 | length 380.7
  Top Layer w11: R26.2@-89.5,725.5 -89.5,762.11 147.23,998.84 U15.1@147.23,1008.18
NetR28_2: R28.2 U16.4 | length 138.8
  Top Layer w6: U16.4@555.5,1875.5 555.5,1883.35 561.5,1889.35 607.36,1889.35 643.62,1853.09 643.62,1842.5 650.62,1835.5 R28.2@655.5,1835.5
NetR29_2: R29.2 U16.3 | length 86.5
  Top Layer w6: U16.3@555.5,1775.5 561.5,1781.5 561.5,1797.22 583.66,1819.37 593.5,1819.37 605.5,1831.37 R29.2@605.5,1835.5
NetR30_1: R30.1 U15.36 | length 252.3
  Top Layer w6: R30.1@118,1583 118,1396 147.23,1366.77 U15.36@147.23,1342.82
NetR31_2: R31.2 U15.15 | length 180.6
  Top Layer w6: U15.15@422.82,1106.6 533.67,1106.6 561.16,1134.09 R31.2@592,1134.09
NetR32_1: R32.1 U15.35 | length 110.1
  Top Layer w6: v2(152.7,1293.59) 155.41,1293.59 165.8,1303.99 166.1,1303.99 166.92,1304.81 U15.35@166.92,1343.01
  Bottom Layer w6: R32.1@100.8,1296.39 103.6,1293.59 v2(152.7,1293.59)
NetR83_2: R83.2 U24.4 | length 69.7
  Top Layer w10: R83.2@3910.54,298.78 3910.58,298.82 U24.4@3910.58,368.46
NetR84_2: R84.2 USB1.4 | length 524.1
  Top Layer w6: R84.2@4359.46,664.12 4477.31,664.12 4665.08,851.89 4712.6,851.89 4744.31,820.18 USB1.4@4792.65,820.18
NetR85_2: R85.2 U24.3 | length 82
  Top Layer w10: R85.2@3738.01,345.81 3772.93,345.81 3795.58,368.46 U24.3@3810.58,368.46
NetR91_2: R91.2 U25.4 | length 88.8
  Top Layer w10: U25.4@4197.07,894.36 R91.2@4197.07,983.13
NetR92_2: R92.2 USB2.4 | length 3096.8
  Top Layer w6: USB2.4@4792.65,1332.68 4846.59,1332.68 4862.2,1348.29 4862.2,1809.19 v2(4807.1,1864.29)
  Bottom Layer w6: R92.2@2685.5,1282.09 2698.64,1282.09 2754.42,1337.88 2754.42,1489.53 3129.6,1864.71 3665.08,1864.71 3701.26,1900.89 4770.5,1900.89 v2(4807.1,1864.29)
NetR93_2: R93.2 U25.3 | length 87.7
  Top Layer w10: U25.3@4297.07,894.36 4350.18,894.36 R93.2@4374.65,918.83
NetR94_2: R94.2 R118.1 USB2.3 | length 4055.3
  Top Layer w6: R118.1@4077.51,1064 4128.05,1013.46 4351,1013.46 4644.63,1307.09 USB2.3@4792.65,1307.09 4834.7,1307.09 4841.48,1300.32 4857.23,1300.32 v2(4864.16,1307.26)
  Bottom Layer w6: R94.2@2685.5,1182.09 2698.02,1194.61 2718.6,1194.61 2806,1282.02 2806,1453.4 3155.26,1802.65 3932.26,1802.65 3970.8,1841.19 4702.8,1841.19 4965.39,1578.61 4965.39,1331.48 4941.16,1307.26 v2(4864.16,1307.26)
NetR95_2: R95.2 USB2.2 | length 3256.3
  Top Layer w6: USB2.2@4792.65,1281.5 4834.7,1281.5 4841.48,1288.28 4857.23,1288.28 v2(4864.16,1281.34)
  Bottom Layer w6: R95.2@2685.5,1232.09 2698.06,1219.53 2720.25,1219.53 2791.3,1290.58 2791.3,1458.79 3151.27,1818.77 3921.71,1818.77 3961.94,1858.99 4718.8,1858.99 4978.51,1599.28 4978.51,1319.6 4940.25,1281.34 v2(4864.16,1281.34)
NetR102_1: R102.1 U22.24 | length 209.3
  Top Layer w6: R102.1@4139.7,1689.09 4139.7,1684.28 U22.24@4284.29,1539.69
NRST: C29.2 K2.1 R54.1 R57.2 R72.2 U19.1 | length 2993.7
  Top Layer w6: K2.1@871,405.29 1016.2,405.29 ; C29.2@986.5,482.09 1017,482.09 v2(1018.63,480.46) ; R57.2@1050.5,482.09 1020.27,482.09 v2(1018.63,480.46) ; U19.1@1269,406.29 U19.1@1268.2,407.09 1266.4,405.29 K2.1@1169,405.29 1016.2,405.29 ; 1016.2,405.29 1018.79,407.88 1018.79,480.31 v2(1018.63,480.46)
  Bottom Layer w6: v2(1018.63,480.46) 980.57,518.52 980.57,727.16 R72.2@1298,1044.59 1298,1103.39 1896.6,1701.99 2306.38,1701.99 2402.5,1605.88 2402.5,1391.33 2380.77,1369.59 R54.1@2335.5,1369.59
OSC_32IN: C27.2 R42.1 Y3.2 | length 172.4
  Top Layer w6: C27.2@1886.5,1444.59 1930.02,1444.59 1955.21,1469.79 Y3.2@1968,1469.79 1980.8,1469.79 2005.99,1444.59 R42.1@2038,1444.59
OSC_32INa: R37.2 R42.2 U18.8 | length 292.2
  Top Layer w6: R42.2@2098,1444.59 v2(2130.5,1444.59) 2145.94,1429.16 2171.95,1429.16 2245.59,1355.52 U18.8@2320.76,1355.52
  Bottom Layer w6: R37.2@2098,1444.59 v2(2130.5,1444.59)
OSC_32OUT: C28.2 R45.1 Y3.1 | length 172.4
  Top Layer w6: C28.2@1886.5,1394.59 1930.01,1394.59 1955.21,1369.4 Y3.1@1968,1369.4 1980.57,1369.4 2005.77,1394.59 R45.1@2038,1394.59
OSC_32OUTa: R38.2 R45.2 U18.9 | length 292.2
  Top Layer w6: R45.2@2098,1394.59 2127.64,1394.59 2141.95,1408.91 2169.59,1408.91 2242.67,1335.83 U18.9@2320.76,1335.83
  Bottom Layer w6: R38.2@2098,1394.59 2127.64,1394.59 v2(2130.16,1397.11)
OSC_IN: C25.2 R36.1 Y2.3 | length 249
  Top Layer w6: C25.2@1899.5,1282.09 1899.5,1215.37 Y2.3@1897.03,1212.9 1917.66,1192.28 1917.66,1184.23 1931.87,1170.02 2000.93,1170.02 R36.1@2038,1207.09
OSC_INa: R36.2 R40.2 U18.12 | length 284.3
  Top Layer w6: R36.2@2098,1207.09 v2(2130.4,1207.09) 2146.1,1207.09 2215.78,1276.77 U18.12@2320.76,1276.77
  Bottom Layer w6: R40.2@2098.2,1205.99 2099.3,1207.09 v2(2130.4,1207.09)
OSC_OUT: C26.2 R39.1 Y2.1 | length 151.8
  Top Layer w6: C26.2@1961.5,1057.09 1963.96,1059.56 Y2.1@1963.96,1126.28 2019.69,1126.28 R39.1@2038,1144.59
OSC_OUTa: R39.2 R41.2 U18.13 | length 304.4
  Top Layer w6: R39.2@2098,1144.59 2100.31,1146.9 2120.14,1146.9 v2(2125.88,1152.65) 2125.88,1159.68 2223.3,1257.09 U18.13@2320.76,1257.09
  Bottom Layer w6: R41.2@2099.3,1142.19 2104.01,1146.9 2120.14,1146.9 v2(2125.88,1152.65)
PA0: CN4.19 U18.20 | length 1342.9
  Top Layer w6: U18.20@2320.76,1119.29 2320.7,1119.37 2272.37,1119.37 2173.21,1020.2 2173.21,805.79 2351.2,627.79 2351.2,203.69 2442,112.89 2442,46.44 CN4.19@2393.11,-2.45
PA1: CN4.22 R67.2 U18.21 | length 2003.1
  Top Layer w6: CN4.22@2493.11,97.55 2493.11,99.33 2365.8,226.64 2365.8,637.89 2190.61,813.08 2190.61,1017.01 2273.22,1099.61 U18.21@2320.76,1099.61 2737.98,1099.61 v6(2793,1044.59)
  Bottom Layer w6: v6(2793,1044.59) 2893,1144.59 R67.2@3050.5,1144.59
PA2: CN4.21 R66.2 U18.22 | length 1682.4
  Top Layer w6: CN4.21@2493.11,-2.45 2540,44.44 2540,118.52 2449.6,208.92 2449.6,578.99 2208.01,820.58 2208.01,1013.71 2274.23,1079.92 U18.22@2320.76,1079.92 2558.82,1079.92 v2(2559.06,1080.17)
  Bottom Layer w6: v2(2559.06,1080.17) 2559.06,1039.74 2604.74,994.06 2613.53,994.06 R66.2@2625.5,982.09
PA3: CN4.26 R51.2 U18.25 | length 1274.4
  Top Layer w6: v2(2280.44,1001.61) 2282.36,1003.53 2282.36,1008.06 2295.17,1020.87 U18.25@2320.76,1020.87 2320.76,981.64 2356.8,945.6 2356.8,767.89 2468.2,656.49 2468.2,228.89 2556.2,140.89 2649.76,140.89 CN4.26@2693.11,97.55
  Bottom Layer w6: R51.2@2212.5,1057.5 2266.47,1003.53 2278.53,1003.53 v2(2280.44,1001.61)
PA4: CN4.25 R43.2 U18.26 | length 1316.2
  Top Layer w6: U18.26@2381.78,959.85 2381.77,775.26 2551.4,605.63 2551.4,233.99 2626.7,158.69 2692.2,158.69 2741.23,109.67 2741.23,45.67 CN4.25@2693.11,-2.45
  Bottom Layer w6: R43.2@2262.5,1057.5 2345,975 v2(2375,975)
PA5: CN4.28 R114.2 U18.27 | length 2616.1
  Top Layer w6: U18.27@2401.46,959.85 2401.46,780.67 2564.4,617.73 2564.4,253.59 2642.3,175.69 2704.2,175.69 2782.35,97.55 CN4.28@2793.11,97.55 ; v2(3797.18,241.32) 3813.56,224.94 R114.2@3946.49,224.94
  Bottom Layer w6: CN4.28@2793.11,97.55 2898.57,203.01 2898.57,402.08 2994.48,497.99 3540.51,497.99 v2(3797.18,241.32)
PA6: CN4.27 R46.2 R56.2 U18.28 | length 1337.3
  Top Layer w6: v2(2412.09,1026.5) 2412.09,1023.79 2421.15,1014.73 U18.28@2421.15,959.85 2421.15,786.08 2648,559.23 2648,260.49 2765.1,143.39 2805.6,143.39 2848.21,100.78 2848.21,52.65 CN4.27@2793.11,-2.45
  Bottom Layer w6: R46.2@2362.5,1057.5 R56.2@2412.5,1057.5 2412.09,1057.09 v2(2412.09,1026.5)
PA7: CN4.30 R47.2 R55.2 U18.29 | length 1332.4
  Top Layer w6: v2(2443.59,1026.04) 2441.94,1024.4 2441.94,960.97 U18.29@2440.83,959.85 2440.84,791.75 2666.1,566.49 2666.1,265.49 2771.5,160.09 2830.56,160.09 CN4.30@2893.11,97.55
  Bottom Layer w6: v2@2443.59,1026.09 R47.2@2475,1057.5 2443.75,1088.75 2443.75,1151.25 R55.2@2462.5,1170 ; R55.2@2463.8,1172.6 R55.2@2466,1170.4
PA8: CN5.32 CN8.6 R69.2 U18.69 | length 1416.9
  Top Layer w6: U18.69@2915.24,1375.2 v2(2990.01,1375.2) 3009.23,1375.2 3092.2,1458.17 3092.2,2126.96 3010.11,2209.05 CN8.6@3010.11,2216.55 3010.11,2381.9 3039.54,2411.34 3039.54,2489.11 CN5.32@2993.11,2535.55
  Bottom Layer w6: v2(2990.01,1375.2) 3044.89,1375.2 R69.2@3050.5,1369.59
PA9: CN5.31 CN8.2 JP3.3 U18.70 | length 3226.1
  Top Layer w6: v2(2862.81,1087.48) 2831.9,1118.39 2831.9,1344.6 2882.2,1394.89 U18.70@2915.24,1394.89 2970.42,1394.89 3001.57,1394.89 3077.89,1471.22 3077.89,2064.8 2968.01,2174.68 2968.01,2410.45 CN5.31@2993.11,2435.55
  Bottom Layer w6: v2(2862.81,1087.48) 2997.2,953.09 3167.8,953.09 3364.48,756.41 JP3.3@3843.61,756.41 ; CN5.31@2993.11,2435.55 3095.17,2333.48 3300.67,2333.48 3410.11,2224.05 CN8.2@3410.11,2216.55 CN8.2@3410.11,2209.05
PA10: CN5.30 CN8.1 JP3.4 U18.71 | length 3800.9
  Top Layer w6: v2(2852.06,1059.79) 2808.09,1103.76 2808.09,1347.26 2875.4,1414.57 U18.71@2915.24,1414.57 ; CN5.30@2893.11,2535.55 2950.66,2478 2950.66,2164.94 3063.59,2052.01 3063.59,1478.67 2999.49,1414.57 2934.18,1414.57 U18.71@2931.2,1411.59
  Bottom Layer w6: v2(2852.06,1059.79) 2972.26,939.59 3151.1,939.59 3384.5,706.19 3893.39,706.19 JP3.4@3943.61,756.41 ; CN5.30@2893.11,2535.55 2942.47,2486.19 3015.97,2486.19 3045.66,2456.5 3045.66,2412.1 3105.86,2351.91 3422.48,2351.91 3510.11,2264.29 CN8.1@3510.11,2216.55 CN8.1@3517.61,2209.05
PA11: CN5.29 CN8.7 R87.1 U18.72 | length 1215.3
  Top Layer w6: CN5.29@2893.11,2435.55 2901.1,2427.55 2901.1,2225.55 CN8.7@2910.11,2216.55 2910.11,2166.89 3049.28,2027.71 3049.28,1494.17 3006.11,1451 v2(3005.16,1451) 2987.4,1433.24 2919.94,1433.24 2917.08,1436.1 U18.72@2915.24,1434.26
  Bottom Layer w6: v2(3005.16,1451) 3044.09,1451 R87.1@3050.5,1444.59
PA12: CN5.28 CN8.8 R86.1 U18.73 | length 1335.7
  Top Layer w6: CN5.28@2793.11,2535.55 2840.2,2488.45 2840.2,2254.14 2810.11,2224.05 CN8.8@2810.11,2216.55 ; CN8.8@2811.1,2216.55 2811.1,2206.59 2810.32,2205.81 2811.1,2194.17 3034.98,1970.29 3034.98,1519.1 3006.63,1490.75 v2(3005.35,1490.75) 3005.35,1489.47 2969.83,1453.94 U18.73@2915.24,1453.94
  Bottom Layer w6: v2(3005.35,1490.75) 3046.65,1490.75 R86.1@3050.5,1494.59
PA13: CN5.25 R70.2 U18.76 | length 980.4
  Top Layer w6: CN5.25@2693.11,2435.55 2761.67,2366.98 2761.67,1938.32 2854.22,1845.77 2854.22,1619.59 U18.76@2854.22,1554.33
  Bottom Layer w6: v2(2855.5,1619.59) R70.2@2855.5,1652.09
PA14: CN5.24 R71.2 U18.77 | length 1145.1
  Top Layer w6: CN5.24@2593.11,2535.55 2640.7,2487.95 2640.7,2412.89 2734.6,2318.99 2734.6,1934.49 2834.54,1834.55 2834.54,1601.99 U18.77@2834.54,1554.33
  Bottom Layer w6: R71.2@2805.5,1652.09 2805.5,1628.79 2832.29,1601.99 v2(2835,1601.99)
PA15: CN5.23 CN6.3 R75.2 U18.78 | length 1286.2
  Top Layer w6: CN5.23@2593.11,2435.55 2700.9,2327.75 2700.9,2016.18 v6(2698.69,2013.96) 2698.69,1937.01 2814.85,1820.84 U18.78@2814.85,1554.33
  Bottom Layer w6: CN6.3@2450.11,2216.55 2593.11,2359.55 CN5.23@2593.11,2435.55 ; R75.2@2689.6,1984.69 2698.69,1993.78 v6(2698.69,2013.96)
PB0: CN4.31 R53.2 U18.32 | length 1501.2
  Top Layer w6: v2(2502.41,1005.53) 2501,1004.12 2501,960.97 U18.32@2499.89,959.85 2499.89,808.39 2852.87,455.41 2852.87,251.51 2964.3,140.07 3011.62,140.07 3047.3,104.39 3047.3,51.74 CN4.31@2993.11,-2.45
  Bottom Layer w6: R53.2@2310.4,1050.3 2318.41,1050.3 2324.21,1044.5 2324.21,1036.49 2355.17,1005.53 v2(2502.41,1005.53)
PB1: CN4.34 R52.2 U18.33 | length 1237.2
  Top Layer w6: v2(2524.89,1015.35) 2524.89,1012.65 2519.57,1007.33 2519.57,813.72 2871.83,461.46 2871.83,254.92 2967.52,159.23 3016.31,159.23 3077.99,97.55 CN4.34@3093.11,97.55
  Bottom Layer w6: v2(2524.89,1015.35) 2524.89,1057.39 R52.2@2525,1057.5
PB2: CN4.33 U18.34 | length 1296.9
  Top Layer w6: U18.34@2539.26,959.85 2536.51,957.1 2536.51,818.75 2888.72,466.54 2888.72,259.57 2975.69,172.59 3024.36,172.59 3055.53,141.42 3118.27,141.42 3138.5,121.19 3138.5,42.94 CN4.33@3093.11,-2.45
PB3: CN5.11 R44.2 R73.2 U18.90 | length 1384.1
  Top Layer w6: CN5.11@1993.11,2435.55 1993.11,2429.05 2090.6,2331.56 2090.6,2174.49 2578.63,1686.46 2578.63,1632.02 ; v7(2450.5,1482.1) 2474.25,1505.85 2561.45,1505.85 2577.52,1521.92 2577.52,1553.22 U18.90@2578.63,1554.33 ; U18.90@2578.63,1554.33 2578.61,1601.49 v7(2578.4,1601.7) 2578.61,1601.92 2578.61,1631.98
  Bottom Layer w6: R44.2@2450,1455 2450.5,1455.5 v7(2450.5,1482.1) ; v7(2578.4,1601.7) 2593,1616.3 R73.2@2593,1652.09
PB4: CN5.10 R76.2 U18.91 | length 1322.5
  Top Layer w6: CN5.10@1893.11,2535.55 1941.03,2487.63 1941.03,2414.03 2006.19,2348.87 2006.19,2189.21 2032.05,2163.34 2069.75,2163.34 2558.94,1674.15 2558.94,1616.47 U18.91@2558.94,1554.33
  Bottom Layer w6: R76.2@2543,1652.09 2544,1651.09 2544,1630.29 2557.82,1616.47 v7(2559.47,1616.47)
PB5: CN5.9 R81.2 U18.92 | length 1721.8
  Top Layer w6: R81.2@1710.5,1969.59 1729.5,1969.59 v6(1766.1,2006.19) ; CN5.9@1893.11,2435.55 1893.11,2423.6 1989.49,2327.21 1989.49,2179 2022.1,2146.4 ; 2022.1,2146.33 2056.7,2146.33 ; 2056.7,2146.4 2539.26,1663.83 U18.92@2539.26,1554.33
  Bottom Layer w6: v6(1766.1,2006.19) 1801.5,2041.59 1801.5,2343.94 CN5.9@1893.11,2435.55
PB6: CN5.8 R79.2 U18.93 | length 1975.4
  Top Layer w6: R79.2@1380.5,2152.09 1424.63,2152.09 v6(1425.23,2152.69) ; CN5.8@1793.11,2535.55 1800.55,2535.55 1842.1,2493.99 1842.1,2416.29 1897.73,2360.66 1897.73,2194.96 1963.37,2129.33 2042.77,2129.33 2519.57,1652.52 U18.93@2519.57,1554.33
  Bottom Layer w6: v6(1425.23,2152.69) 1487.5,2214.96 1487.5,2250.89 1561.3,2324.69 1667.4,2324.69 1747.3,2404.59 1747.3,2489.74 CN5.8@1793.11,2535.55
PB7: CN5.7 CN6.9 R83.1 U18.94 | length 5682.4
  Top Layer w6: CN5.7@1793.11,2435.55 1793.11,2429.98 1850.11,2372.98 CN6.9@1850.11,2221.19 ; CN6.9@1850.11,2216.55 1850.11,2195.79 1933.57,2112.32 2027.77,2112.32 2499.89,1640.2 U18.94@2499.89,1554.33 ; v2(3612.46,1979.58) 3612.46,1853.91 3745.37,1721 3745.37,987.88 3642.31,884.82 3642.31,375.79 3719.32,298.78 R83.1@3850.54,298.78
  Bottom Layer w6: CN5.7@1793.11,2435.55 1842.97,2485.41 1842.97,2570.75 1888.84,2616.62 3501.16,2616.62 3542.84,2574.94 3542.84,2334.87 3612.46,2265.25 v2(3612.46,1979.58)
PB8: CN5.6 CN6.10 R65.2 U18.95 | length 1919.2
  Top Layer w6: CN5.6@1693.11,2535.55 1744.29,2484.37 1744.29,2222.37 CN6.10@1750.11,2216.55 1871.34,2095.31 2013.78,2095.31 2480.2,1628.89 U18.95@2480.2,1554.33
  Bottom Layer w6: R65.2@1298,2032.09 1565.65,2032.09 CN6.10@1750.11,2216.55
PB9: CN5.5 U18.96 | length 1308.7
  Top Layer w6: CN5.5@1693.11,2435.55 1693.11,2433.79 1705.33,2421.56 1705.33,2185.56 1812.59,2078.31 1999.79,2078.31 2460.52,1617.57 U18.96@2460.52,1554.33
PB10: CN3.8 CN4.48 U18.47 | length 2396.9
  Top Layer w6: CN3.8@3625.12,1117.14 3575.56,1166.69 3366.28,1166.69 3183.69,984.1 2879.21,984.1 2853.15,1010.17 2809.12,1010.17 2795.17,996.21 U18.47@2795.17,959.85 2795.17,909.62 3255.2,449.6 3366.8,449.6 3470.4,345.99 3470.4,289.09 3510.9,248.59 3642.06,248.59 CN4.48@3793.11,97.55
PB11: CN4.49 R64.2 U18.50 | length 1717.3
  Top Layer w6: U18.50@2854.22,959.85 2999.85,959.85 3845.4,114.3 3845.4,45.25 CN4.49@3893.11,-2.45 ; 3240.98,718.72 v2(3380.15,857.89)
  Bottom Layer w6: v2(3380.15,857.89) 3408.35,886.09 R64.2@3411.05,886.09
PB12: CN3.7 CN5.50 R62.2 U18.51 | length 2336
  Top Layer w6: U18.51@2915.26,1020.85 3018.25,1020.85 v2(3018.52,1021.12) 3018.86,1020.78 3165.55,1020.78 3391.7,1246.93 3391.7,1847.71 3941.63,2397.65 3941.63,2487.02 CN5.50@3893.11,2535.55
  Bottom Layer w6: v2(3018.52,1021.12) 3022.74,1021.12 3046.21,1044.59 R62.2@3050.5,1044.59 ; v2(3391.4,1246.63) 3395.63,1246.63 CN3.7@3525.12,1117.14
PB13: CN3.3 CN5.49 R63.2 U18.52 | length 2204.8
  Top Layer w6: U18.52@2915.24,1040.55 2963.55,1040.55 2992.34,1040.55 3163.56,1040.55 3372.64,1249.63 3372.64,1316.04 v2(3372.4,1316.29) 3372.4,1851.43 3893.11,2372.14 CN5.49@3893.11,2435.55
  Bottom Layer w6: v2(2963.55,1040.76) 3009.72,994.59 R63.2@3050.5,994.59 ; v2(3372.4,1316.29) 3373.25,1317.14 CN3.3@3525.12,1317.14
PB14: CN3.1 CN5.48 U18.53 | length 2202.4
  Top Layer w6: U18.53@2915.24,1060.24 2955.74,1060.24 3160.65,1060.24 3347.49,1247.08 v2(3347.49,1414.92) 3346.8,1415.61 3346.8,1847.68 3842.1,2342.98 3842.1,2486.55 CN5.48@3793.11,2535.55
  Bottom Layer w6: v2(3347.49,1414.92) 3349.71,1417.14 CN3.1@3525.12,1417.14
PB15: CN3.4 CN5.47 U18.54 | length 2185.7
  Top Layer w6: U18.54@2915.24,1079.92 3159.93,1079.92 3322.7,1242.69 v2(3322.7,1364.89) 3321.6,1365.99 3321.6,1848.01 3793.11,2319.52 CN5.47@3793.11,2435.55
  Bottom Layer w6: v2(3322.7,1364.89) 3323,1364.59 3577.66,1364.59 CN3.4@3625.12,1317.14
PC0: CN4.16 R95.1 U18.15 | length 1625.1
  Top Layer w6: CN4.16@2193.11,97.55 2055.5,235.15 2055.5,999.04 2274.18,1217.72 U18.15@2320.76,1217.72 2588.09,1217.72 v2(2588.14,1217.67)
  Bottom Layer w6: v2(2588.14,1217.67) 2590.18,1219.71 2613.11,1219.71 R95.1@2625.5,1232.09
PC1: CN4.15 R61.2 R94.1 U18.16 | length 1757.7
  Top Layer w6: CN4.15@2193.11,-2.45 2240.2,44.64 2240.2,110.39 2148.8,201.79 2148.8,714.19 2103.59,759.4 2103.59,1027.38 2274.26,1198.04 U18.16@2320.76,1198.03 ; U18.16@2320.76,1198.03 2583.01,1198.01 v2(2589.05,1191.98)
  Bottom Layer w6: v2(2589.05,1191.98) 2592.21,1195.14 2612.45,1195.14 R94.1@2625.5,1182.09 R61.2@2625.5,1132.09
PC2: CN4.18 R92.1 U18.17 | length 1641.8
  Top Layer w6: CN4.18@2293.11,97.55 2166.5,224.15 2166.5,724.69 2120.99,770.2 2120.99,1025.59 2273.76,1178.35 U18.17@2320.76,1178.35 2321.34,1178.93 2558.6,1178.93 v2(2559.17,1179.51)
  Bottom Layer w6: v2(2559.17,1179.51) 2559.17,1233.66 2594.61,1269.09 2612.5,1269.09 R92.1@2625.5,1282.09
PC3: CN4.17 R96.1 U18.18 | length 1402.2
  Top Layer w6: CN4.17@2293.11,-2.45 2339.1,43.54 2339.1,118.09 2248.3,208.89 2248.3,673.69 v2(2218.1,703.89) 2138.4,783.6 2138.4,1024.89 2272.18,1158.67 U18.18@2320.76,1158.66
  Bottom Layer w6: R96.1@2184.2,706.19 2186.5,703.89 v2(2218.1,703.89)
PC4: CN4.29 R59.2 U18.30 | length 1464.8
  Top Layer w6: U18.30@2460.52,987.02 2460.52,797.16 2749.5,508.18 2749.5,236.09 2808.3,177.29 2875.9,177.29 2940.3,112.89 2940.3,44.74 CN4.29@2893.11,-2.45 ; U18.30@2460.79,987.28 2460.79,1018.89 2492.87,1050.97 2579.02,1050.97 v2(2579.73,1050.27)
  Bottom Layer w6: v2(2579.73,1050.27) 2582.44,1050.27 2588,1044.7 2612.89,1044.7 R59.2@2625.5,1032.09
PC5: CN4.32 R60.2 U18.31 | length 1358.6
  Top Layer w6: v2(2599.4,1069.7) 2599.4,1044.8 2586.95,1032.35 2498.55,1032.35 2481.29,1015.09 2481.29,960.95 U18.31@2480.2,959.85 2480.2,802.8 2766.8,516.2 2766.8,252.89 2826.77,192.92 2886.97,192.92 2982.35,97.55 CN4.32@2993.11,97.55
  Bottom Layer w6: v2(2599.4,1069.7) 2613.11,1069.7 R60.2@2625.5,1082.09
PC6: CN5.36 CN8.3 U18.65 | length 1523.3
  Top Layer w6: U18.65@2915.24,1296.46 3038.41,1296.46 3149.41,1407.46 3149.41,2046.61 3310.11,2207.3 CN8.3@3310.11,2216.55 3242.66,2284 3242.66,2486 CN5.36@3193.11,2535.55
PC7: CN5.35 CN8.4 U18.66 | length 1313.6
  Top Layer w6: U18.66@2915.24,1316.15 3025.71,1316.15 3135.11,1425.55 3135.11,2098.53 3210.5,2173.92 3210.5,2406.29 3193.11,2423.69 CN5.35@3193.11,2435.55
PC8: CN5.34 R68.2 U18.67 | length 1460.2
  Top Layer w6: U18.67@2915.24,1335.83 3020.54,1335.83 3120.81,1436.1 3120.81,2145.7 3159.31,2184.2 3159.31,2373.89 3140.1,2393.09 3140.1,2488.55 CN5.34@3093.11,2535.55
  Bottom Layer w6: v2(2987.1,1336.19) 3003.7,1319.59 R68.2@3050.5,1319.59
PC9: CN5.33 CN8.5 U18.68 | length 1217.9
  Top Layer w6: U18.68@2915.24,1355.52 3015.35,1355.52 3106.5,1446.68 CN8.5@3106.5,2216.55 ; CN8.5@3093.11,2216.55 CN5.33@3093.11,2435.55
PC10: CN5.22 CN6.6 R80.2 U18.79 | length 2170.7
  Top Layer w6: CN5.22@2493.11,2535.55 2546.7,2481.95 2546.7,2402.99 2607.2,2342.49 2607.2,1999.89 2795.17,1811.92 U18.79@2795.17,1554.33
  Bottom Layer w6: R80.2@1710.5,1969.59 1711.1,1970.19 1903.75,1970.19 CN6.6@2150.11,2216.55 2150.11,2226 2270.7,2346.59 2375.5,2346.59 2444.3,2415.39 2444.3,2486.74 CN5.22@2493.11,2535.55
PC11: CN5.21 CN6.5 U18.80 | length 1380.7
  Top Layer w6: CN5.21@2493.11,2435.55 2590.4,2338.25 2590.4,1985.69 2775.48,1800.61 U18.80@2775.48,1554.33
  Bottom Layer w6: CN6.5@2250.11,2216.55 2250.11,2299.9 2278.7,2328.49 2386.05,2328.49 CN5.21@2493.11,2435.55
PC12: CN5.20 CN6.4 U18.81 | length 1319.7
  Top Layer w6: CN5.20@2393.11,2535.55 2442.9,2485.75 2442.9,2423.99 2509.32,2357.58 2509.32,2163.11 v2(2511.09,2161.35) 2511.82,2160.61 2511.82,2033.27 2755.8,1789.29 U18.81@2755.8,1554.33
  Bottom Layer w6: CN6.4@2350.11,2216.55 2350.11,2209.05 2397.81,2161.35 v2(2511.09,2161.35)
PC13: CN4.8 U18.7 | length 2044.9
  Top Layer w6: CN4.8@1793.11,97.55 1756.12,134.53 1756.12,1466.7 1826.01,1536.59 2119.97,1536.59 2281.36,1375.2 U18.7@2320.76,1375.2
PC14: CN4.7 R37.1 | length 1569.6
  Bottom Layer w6: CN4.7@1793.11,-2.45 1846.6,51.04 1846.6,135.09 1902.66,191.15 1902.66,1259.45 1969.4,1326.2 1969.4,1412 2001.99,1444.59 R37.1@2038,1444.59
PC15: CN4.10 R38.1 | length 1373.2
  Bottom Layer w6: CN4.10@1893.11,97.55 1893.11,100.06 1918.41,125.37 1918.41,1242.81 1989.3,1313.69 1989.3,1377.69 2006.2,1394.59 R38.1@2035.5,1394.59